# Altium PCB machkiemtranguon.PcbDoc (part 2 of 2)
Units mm, origin at the board's own origin, x right, y up, seen from the top; angles counter-clockwise.
Board outline 125.2 x 94.23 mm, 2 copper layers (Top Layer, Bottom Layer); 89 components, 67 nets, 385 pads, 74 vias.
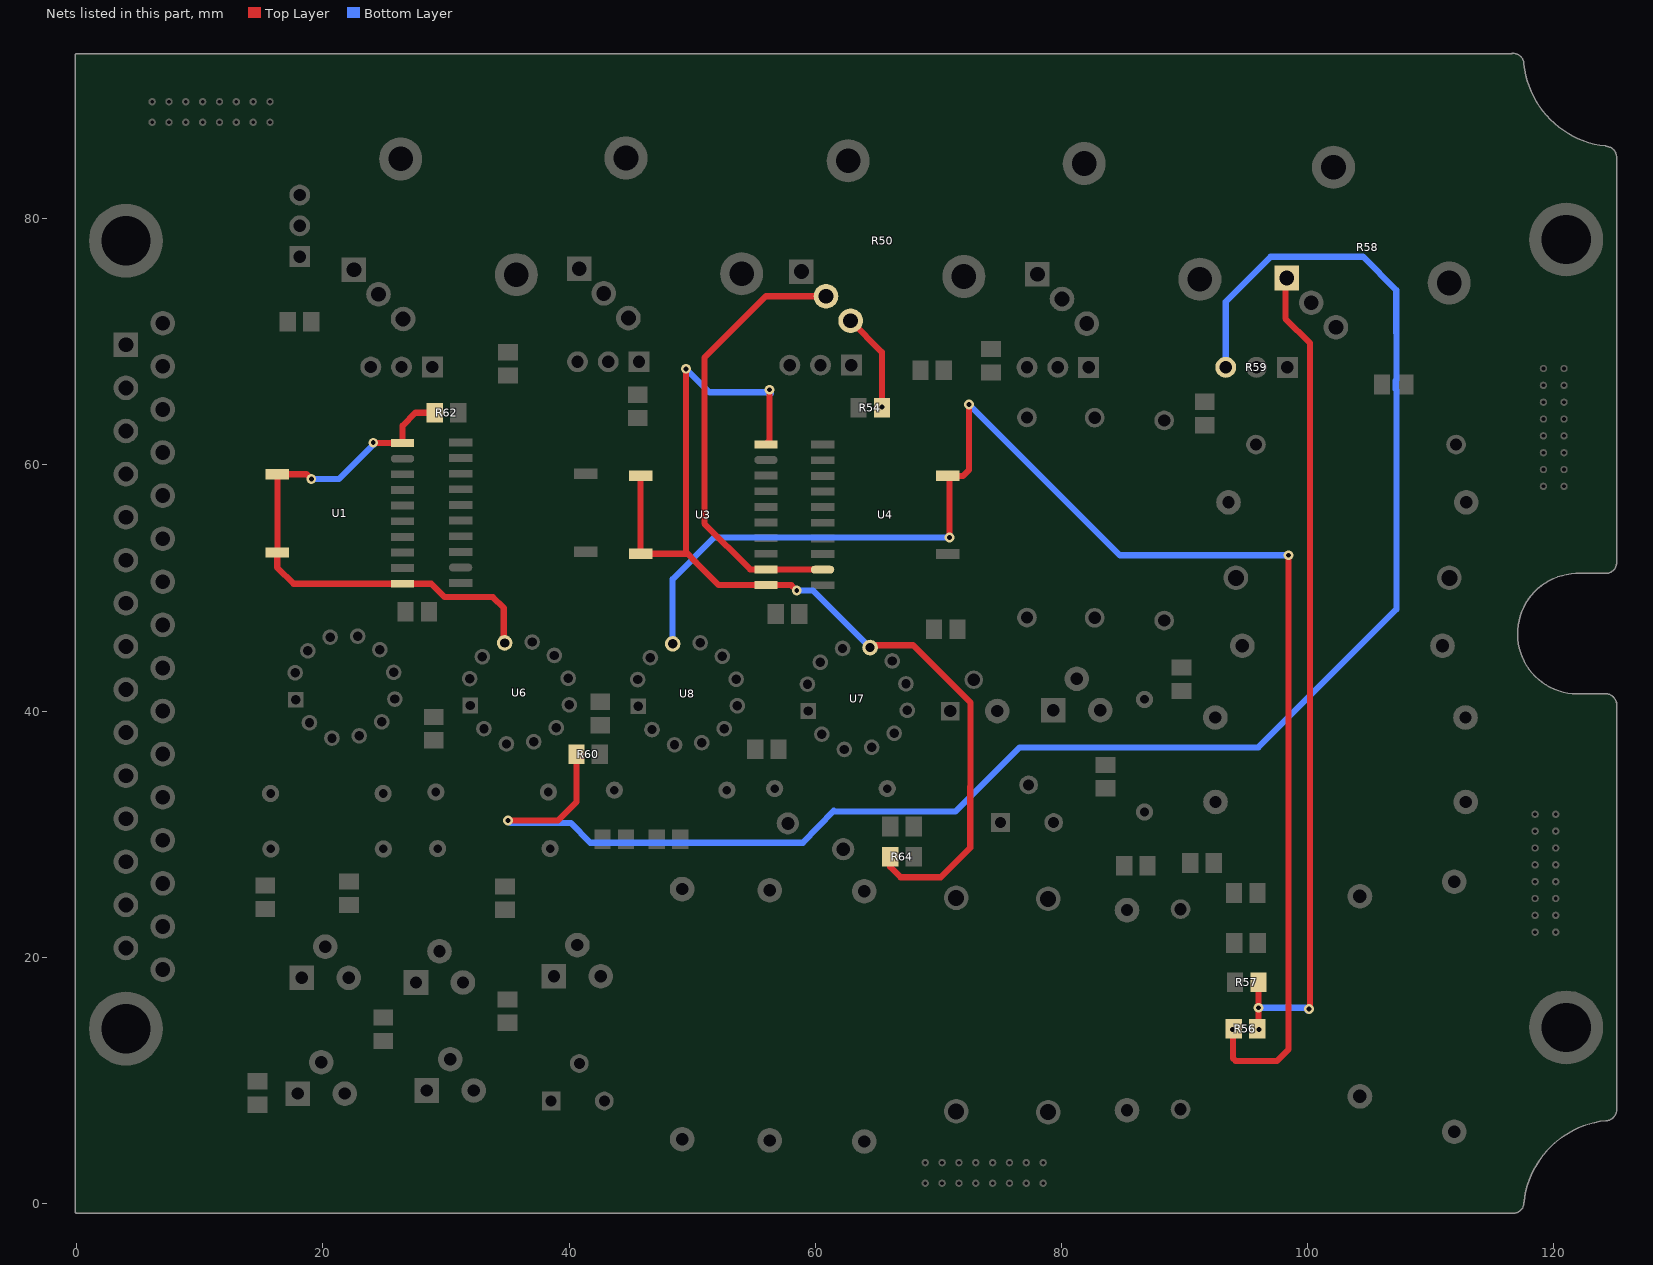
[diagram p2: the nets of this part, all layers, seen from the top]

## Via types
v1: diameter 0.8, hole 0.4, Top Layer to Bottom Layer, 74 vias

## Nets (pads, with @x,y where several pads share a name; then routed paths per layer and width w, separated by ;. In a path a pad name is that pad's centre, name@x,y a point inside that pad or via, vN(x,y) a via of type N, cw(c..) or ccw(c..) an arc to the next point about the centre after c; other vN are vias at no path point) (continued)
NetR50_2: R50.2 U3.8 U4.1 | length 36.9
  Top Layer w0.5: U3.8@55.672,51.486 U4.1@60.592,51.486 ; U3.8@55.997,51.505 54.72,51.505 50.997,55.228 50.997,68.7 55.997,73.7 R50.2@60.872,73.7
NetR50_3: R50.3 R54.1 | length 8.1
  Top Layer w0.5: R50.3@62.872,71.7 65.422,69.15 R54.1@65.422,64.65
  other v1: 65.426,64.698
NetR56_1: R56.1 U4.10 U8.10 | length 120.5
  Top Layer w0.5: U4.10@70.246,59.106 U4.10@70.752,59.106 70.897,59.106 v1(70.897,54.1) ; U4.10@70.997,59.1 70.997,59.106 72.003,59.106 72.497,59.6 v1(72.497,64.9) ; R56.1@93.922,14.25 93.922,11.8 94.147,11.575 97.522,11.575 98.44,12.493 v1(98.44,52.654)
  Bottom Layer w0.5: U8.10@48.69,45.407 48.415,45.682 48.415,50.718 51.797,54.1 v1@70.797,54.1 ; v1(72.497,64.9) 84.743,52.654 v1(98.44,52.654)
  other v1: 93.879,14.123
NetR56_2: R56.2 R57.2 R58.1 | length 68.2
  Top Layer w0.5: R56.2@95.998,14.199 R57.2@95.998,17.973 ; R58.1@98.197,75.4 98.197,71.875 100.197,69.875 v1@100.197,15.9
  Bottom Layer w0.5: v1(95.997,15.9) 99.797,15.9 v1@99.997,15.7
  other v1: 96.032,14.123 100.097,15.8
NetR59_3: R59.3 R60.1 | length 138.6
  Top Layer w0.5: v1@35.097,31.1 39.097,31.1 40.598,32.601 R60.1@40.598,36.498
  Bottom Layer w0.5: v1(35.041,31.115) 35.257,30.9 40.159,30.9 41.697,29.362 ; 41.719,29.3 58.997,29.3 61.497,31.9 61.547,31.85 71.397,31.85 76.597,37.05 95.98,37.05 107.203,48.273 107.203,66.091 107.15,66.144 107.15,66.848 107.203,66.901 107.203,70.7 ; R59.3@93.347,67.925 93.347,73.254 96.993,76.9 104.497,76.9 107.197,74.2 107.197,70.7
NetR62_2: R62.2 U1.9 U1.10 U1.11 U1.12 U6.10 | length 46.5
  Top Layer w0.5: v1(19.062,58.852) 18.684,59.23 U1.11@16.312,59.23 U1.10@16.312,52.88 16.296,52.88 16.296,51.661 17.617,50.34 U1.9@26.472,50.34 ; v1(24.097,61.8) 24.127,61.77 U1.12@26.472,61.77 26.472,63.175 27.524,64.227 R62.2@29.096,64.227 ; U1.9@26.472,50.4 U1.9@26.472,50.34 ; 29.872,49.251 33.821,49.251 34.697,48.375 U6.10@34.697,45.6 ; 29.872,49.275 28.807,50.34 U1.9@26.472,50.34 ; U6.10@34.697,45.475 U6.10@34.697,45.6 ; U6.10@34.765,45.532 U6.10@34.697,45.6
  Bottom Layer w0.5: v1(19.062,58.852) 21.325,58.852 24.097,61.624 v1(24.097,61.8)
NetR64_1: R64.1 U3.9 U3.10 U3.11 U3.12 U7.9 | length 85.6
  Top Layer w0.5: U3.10@45.797,52.95 U3.11@45.797,58.818 ; U3.10@45.837,52.775 49.497,52.775 v1(49.497,67.8) v1@49.497,67.9 ; 49.597,52.8 50.307,52.09 ; 50.307,52.089 52.161,50.235 U3.9@55.997,50.235 58.062,50.235 v1(58.497,49.8) ; U3.12@55.997,61.665 56.276,61.944 56.276,66.079 v1(56.297,66.1) ; U7.9@64.45,45.158 64.643,45.351 67.946,45.351 72.599,40.698 72.599,33.875 72.597,33.873 72.597,28.9 70.197,26.5 66.936,26.5 66.098,27.338 R64.1@66.098,28.173
  Bottom Layer w0.5: v1(49.497,67.8) 51.397,65.9 56.297,65.9 v1@56.397,65.8 ; v1(58.497,49.8) 59.808,49.8 U7.9@64.45,45.158
pads on no net: R6.4 R6.5 R15.4 R15.5 R47.4 R47.5 R50.4 R50.5 R58.4 R58.5 U1.3 U1.5 U1.6 U1.7 U1.8 U2.1 U2.2 U2.3 U2.4 U2.6 U2.9 U2.11 U2.12 U3.1 U3.2 U3.3 U3.6 U4.3 U4.6 U4.7 U4.8 U4.9 U4.11 U4.12 U5.2 U5.3 U5.6 U5.8 U5.11 U5.12 U6.2 U6.3 U6.6 U6.8 U6.11 U6.12 U7.2 U7.3 U7.6 U7.8 U7.11 U7.12 U8.2 U8.3 U8.6 U8.8 U8.11 U8.12

## Polygon pours and split planes (outlines as drawn)
GND on Top Layer "Top Layer-No Net" (solid, remove dead copper, pour order 9): 0,-0.8 116.684,-0.8 ccw(c116.697,-0.701) 116.699,-0.801 ccw(c116.684,0.088) 117.573,0.088 ccw(c116.684,0.088) 117.573,0.101 ccw(c117.476,0.125) 117.575,0.114 cw(c124.997,-0.7) 124.211,6.724 ccw(c124.222,6.824) 124.224,6.724 ccw(c124.209,7.613) 125.089,7.485 ccw(c124.997,7.525) 125.097,7.525 125.097,7.573 ccw(c124.209,7.613) 125.098,7.613 ccw(c124.209,7.613) 125.097,7.652 125.097,40.513 ccw(c124.998,40.525) 125.098,40.525 ccw(c124.998,40.525) 125.098,40.527 ccw(c124.209,40.512) 125.097,40.552 125.097,40.65 ccw(c124.997,40.65) 125.075,40.713 ccw(c124.209,40.512) 124.368,41.387 ccw(c124.318,41.3) 124.318,41.4 124.25,41.4 ccw(c124.209,40.512) 124.169,41.4 121.502,41.4 cw(c121.949,46.279) 121.779,51.176 ccw(c121.797,51.275) 121.797,51.175 124.21,51.175 ccw(c124.222,51.274) 124.224,51.174 ccw(c124.209,52.063) 125.083,51.898 ccw(c124.997,51.95) 125.097,51.95 125.097,52.023 ccw(c124.209,52.063) 125.098,52.063 ccw(c124.209,52.063) 125.097,52.102 125.097,84.993 ccw(c124.997,85.001) 125.098,85.001 ccw(c124.997,85.001) 125.098,85.002 ccw(c124.21,84.988) 124.243,85.875 ccw(c124.172,85.804) 124.183,85.903 cw(c124.997,93.325) 117.573,92.539 ccw(c117.473,92.55) 117.573,92.55 ccw(c117.473,92.55) 117.573,92.552 ccw(c116.684,92.537) 116.642,93.425 ccw(c116.647,93.325) 116.581,93.4 -0.003,93.4 ccw(c-0.003,93.3) -0.1,93.276 -0.1,-0.7 ccw(c0,-0.7)
GND on Bottom Layer "Top Layer-No Net1" (solid, remove dead copper, pour order 10): 0,-0.8 116.684,-0.8 ccw(c116.697,-0.701) 116.699,-0.801 ccw(c116.684,0.088) 117.573,0.088 ccw(c116.684,0.088) 117.573,0.101 ccw(c117.476,0.125) 117.575,0.114 cw(c124.997,-0.7) 124.211,6.724 ccw(c124.222,6.824) 124.224,6.724 ccw(c124.209,7.613) 125.089,7.485 ccw(c124.997,7.525) 125.097,7.525 125.097,7.573 ccw(c124.209,7.613) 125.098,7.613 ccw(c124.209,7.613) 125.097,7.652 125.097,40.513 ccw(c124.998,40.525) 125.098,40.525 ccw(c124.998,40.525) 125.098,40.527 ccw(c124.209,40.512) 125.097,40.552 125.097,40.65 ccw(c124.997,40.65) 125.075,40.713 ccw(c124.209,40.512) 124.368,41.387 ccw(c124.318,41.3) 124.318,41.4 124.25,41.4 ccw(c124.209,40.512) 124.169,41.4 121.502,41.4 cw(c121.949,46.279) 121.779,51.176 ccw(c121.797,51.275) 121.797,51.175 124.21,51.175 ccw(c124.222,51.274) 124.224,51.174 ccw(c124.209,52.063) 125.083,51.898 ccw(c124.997,51.95) 125.097,51.95 125.097,52.023 ccw(c124.209,52.063) 125.098,52.063 ccw(c124.209,52.063) 125.097,52.102 125.097,84.993 ccw(c124.997,85.001) 125.098,85.001 ccw(c124.997,85.001) 125.098,85.002 ccw(c124.21,84.988) 124.243,85.875 ccw(c124.172,85.804) 124.183,85.903 cw(c124.997,93.325) 117.573,92.539 ccw(c117.473,92.55) 117.573,92.55 ccw(c117.473,92.55) 117.573,92.552 ccw(c116.684,92.537) 116.642,93.425 ccw(c116.647,93.325) 116.581,93.4 -0.003,93.4 ccw(c-0.003,93.3) -0.1,93.276 -0.1,-0.7 ccw(c0,-0.7)

## Keep-outs
Keep-Out Layer:
  lines w0.2: -0.003,93.3 116.797,93.3 ; 0,93.3 0,-0.7 116.697,-0.7 ; 116.647,93.325 cw(c116.684,92.537) 117.473,92.55 ; 116.697,-0.701 ccw(c116.684,0.088) 117.472,0.125 ; 117.47,92.55 ccw(c124.997,93.325) 124.172,85.804 ; 117.476,0.125 cw(c124.997,-0.7) 124.319,6.836 ; 121.496,41.3 cw(c121.949,46.279) 122.119,51.277 ; 121.497,41.3 124.318,41.3 ; 121.797,51.275 124.222,51.275 ; 124.172,41.3 cw(c124.209,40.512) 124.998,40.525 ; 124.222,6.824 ccw(c124.209,7.613) 124.997,7.65 ; 124.222,51.274 ccw(c124.209,52.063) 124.997,52.1 ; 124.997,7.525 124.997,40.65 ; 124.997,51.95 124.997,85 ; 124.997,85.001 ccw(c124.21,84.988) 124.173,85.775 ; 116.697,-0.7 116.697,-0.7 ; 124.172,85.775 124.172,85.775

## Other copper
Top Layer:
  pour cut-out: -439.003,-258.7 -438.749,-258.7 -438.749,-258.446 -439.003,-258.446
  pour cut-out: -439.003,-258.7 -438.749,-258.7 -438.749,-258.446 -439.003,-258.446
  pour cut-out: -439.003,-258.7 -438.749,-258.7 -438.749,-258.446 -439.003,-258.446
  pour cut-out: -439.003,-258.7 -438.749,-258.7 -438.749,-258.446 -439.003,-258.446
  pour cut-out: -439.003,-258.7 -438.749,-258.7 -438.749,-258.446 -439.003,-258.446
  pour cut-out: -439.003,-258.7 -438.749,-258.7 -438.749,-258.446 -439.003,-258.446
  pour cut-out: -439.003,-258.7 -438.749,-258.7 -438.749,-258.446 -439.003,-258.446
  pour cut-out: -439.003,-258.7 -438.749,-258.7 -438.749,-258.446 -439.003,-258.446
  pour cut-out: -439.003,-258.7 -438.749,-258.7 -438.749,-258.446 -439.003,-258.446
  pour cut-out: -439.003,-258.7 -438.749,-258.7 -438.749,-258.446 -439.003,-258.446
  pour cut-out: -439.003,-258.7 -438.749,-258.7 -438.749,-258.446 -439.003,-258.446
  pour cut-out: -439.003,-258.7 -438.749,-258.7 -438.749,-258.446 -439.003,-258.446
  pour cut-out: -439.003,-258.7 -438.749,-258.7 -438.749,-258.446 -439.003,-258.446
  pour cut-out: -439.003,-258.7 -438.749,-258.7 -438.749,-258.446 -439.003,-258.446
  pour cut-out: -439.003,-258.7 -438.749,-258.7 -438.749,-258.446 -439.003,-258.446
  pour cut-out: -439.003,-258.7 -438.749,-258.7 -438.749,-258.446 -439.003,-258.446
  pour cut-out: -439.003,-258.7 -438.749,-258.7 -438.749,-258.446 -439.003,-258.446
  pour cut-out: -439.003,-258.7 -438.749,-258.7 -438.749,-258.446 -439.003,-258.446
  pour cut-out: -439.003,-258.7 -438.749,-258.7 -438.749,-258.446 -439.003,-258.446
  pour cut-out: -439.003,-258.7 -438.749,-258.7 -438.749,-258.446 -439.003,-258.446
  pour cut-out: -439.003,-258.7 -438.749,-258.7 -438.749,-258.446 -439.003,-258.446
  pour cut-out: -439.003,-258.7 -438.749,-258.7 -438.749,-258.446 -439.003,-258.446
  pour cut-out: -439.003,-258.7 -438.749,-258.7 -438.749,-258.446 -439.003,-258.446
  pour cut-out: -439.003,-258.7 -438.749,-258.7 -438.749,-258.446 -439.003,-258.446
  pour cut-out: -439.003,-258.7 -438.749,-258.7 -438.749,-258.446 -439.003,-258.446
  pour cut-out: -439.003,-258.7 -438.749,-258.7 -438.749,-258.446 -439.003,-258.446
  pour cut-out: -439.003,-258.7 -438.749,-258.7 -438.749,-258.446 -439.003,-258.446
  pour cut-out: -439.003,-258.7 -438.749,-258.7 -438.749,-258.446 -439.003,-258.446
  pour cut-out: -439.003,-258.7 -438.749,-258.7 -438.749,-258.446 -439.003,-258.446
  pour cut-out: -439.003,-258.7 -438.749,-258.7 -438.749,-258.446 -439.003,-258.446
  pour cut-out: -439.003,-258.7 -438.749,-258.7 -438.749,-258.446 -439.003,-258.446
  pour cut-out: -439.003,-258.7 -438.749,-258.7 -438.749,-258.446 -439.003,-258.446
  pour cut-out: -439.003,-258.7 -438.749,-258.7 -438.749,-258.446 -439.003,-258.446
  pour cut-out: -439.003,-258.7 -438.749,-258.7 -438.749,-258.446 -439.003,-258.446
  pour cut-out: -439.003,-258.7 -438.749,-258.7 -438.749,-258.446 -439.003,-258.446
  pour cut-out: -439.003,-258.7 -438.749,-258.7 -438.749,-258.446 -439.003,-258.446
  pour cut-out: -439.003,-258.7 -438.749,-258.7 -438.749,-258.446 -439.003,-258.446
  pour cut-out: -439.003,-258.7 -438.749,-258.7 -438.749,-258.446 -439.003,-258.446
  pour cut-out: -439.003,-258.7 -438.749,-258.7 -438.749,-258.446 -439.003,-258.446
  pour cut-out: -439.003,-258.7 -438.749,-258.7 -438.749,-258.446 -439.003,-258.446
  pour cut-out: -439.003,-258.7 -438.749,-258.7 -438.749,-258.446 -439.003,-258.446
  pour cut-out: -439.003,-258.7 -438.749,-258.7 -438.749,-258.446 -439.003,-258.446
  pour cut-out: -439.003,-258.7 -438.749,-258.7 -438.749,-258.446 -439.003,-258.446
  pour cut-out: -439.003,-258.7 -438.749,-258.7 -438.749,-258.446 -439.003,-258.446
  pour cut-out: -439.003,-258.7 -438.749,-258.7 -438.749,-258.446 -439.003,-258.446
  pour cut-out: -439.003,-258.7 -438.749,-258.7 -438.749,-258.446 -439.003,-258.446
  pour cut-out: -439.003,-258.7 -438.749,-258.7 -438.749,-258.446 -439.003,-258.446
  pour cut-out: -439.003,-258.7 -438.749,-258.7 -438.749,-258.446 -439.003,-258.446
  pour cut-out: -439.003,-258.7 -438.749,-258.7 -438.749,-258.446 -439.003,-258.446
  pour cut-out: -439.003,-258.7 -438.749,-258.7 -438.749,-258.446 -439.003,-258.446
  pour cut-out: -439.003,-258.7 -438.749,-258.7 -438.749,-258.446 -439.003,-258.446
  pour cut-out: -439.003,-258.7 -438.749,-258.7 -438.749,-258.446 -439.003,-258.446
  pour cut-out: -439.003,-258.7 -438.749,-258.7 -438.749,-258.446 -439.003,-258.446
  pour cut-out: -439.003,-258.7 -438.749,-258.7 -438.749,-258.446 -439.003,-258.446
  pour cut-out: -439.003,-258.7 -438.749,-258.7 -438.749,-258.446 -439.003,-258.446
  pour cut-out: -439.003,-258.7 -438.749,-258.7 -438.749,-258.446 -439.003,-258.446
  pour cut-out: -439.003,-258.7 -438.749,-258.7 -438.749,-258.446 -439.003,-258.446
  pour cut-out: -439.003,-258.7 -438.749,-258.7 -438.749,-258.446 -439.003,-258.446
  pour cut-out: -439.003,-258.7 -438.749,-258.7 -438.749,-258.446 -439.003,-258.446
  pour cut-out: -439.003,-258.7 -438.749,-258.7 -438.749,-258.446 -439.003,-258.446
  pour cut-out: -439.003,-258.7 -438.749,-258.7 -438.749,-258.446 -439.003,-258.446
  pour cut-out: -439.003,-258.7 -438.749,-258.7 -438.749,-258.446 -439.003,-258.446
  pour cut-out: -439.003,-258.7 -438.749,-258.7 -438.749,-258.446 -439.003,-258.446
  pour cut-out: -439.003,-258.7 -438.749,-258.7 -438.749,-258.446 -439.003,-258.446
  pour cut-out: -439.003,-258.7 -438.749,-258.7 -438.749,-258.446 -439.003,-258.446
  pour cut-out: -439.003,-258.7 -438.749,-258.7 -438.749,-258.446 -439.003,-258.446
  pour cut-out: -439.003,-258.7 -438.749,-258.7 -438.749,-258.446 -439.003,-258.446
  pour cut-out: -439.003,-258.7 -438.749,-258.7 -438.749,-258.446 -439.003,-258.446
  pour cut-out: -439.003,-258.7 -438.749,-258.7 -438.749,-258.446 -439.003,-258.446
  pour cut-out: -439.003,-258.7 -438.749,-258.7 -438.749,-258.446 -439.003,-258.446
  pour cut-out: -439.003,-258.7 -438.749,-258.7 -438.749,-258.446 -439.003,-258.446
  pour cut-out: -439.003,-258.7 -438.749,-258.7 -438.749,-258.446 -439.003,-258.446
  pour cut-out: -439.003,-258.7 -438.749,-258.7 -438.749,-258.446 -439.003,-258.446
  pour cut-out: -439.003,-258.7 -438.749,-258.7 -438.749,-258.446 -439.003,-258.446
  pour cut-out: -439.003,-258.7 -438.749,-258.7 -438.749,-258.446 -439.003,-258.446
  pour cut-out: -439.003,-258.7 -438.749,-258.7 -438.749,-258.446 -439.003,-258.446
  pour cut-out: -439.003,-258.7 -438.749,-258.7 -438.749,-258.446 -439.003,-258.446
  pour cut-out: -439.003,-258.7 -438.749,-258.7 -438.749,-258.446 -439.003,-258.446
  pour cut-out: -439.003,-258.7 -438.749,-258.7 -438.749,-258.446 -439.003,-258.446
  pour cut-out: -439.003,-258.7 -438.749,-258.7 -438.749,-258.446 -439.003,-258.446
  pour cut-out: -439.003,-258.7 -438.749,-258.7 -438.749,-258.446 -439.003,-258.446
  pour cut-out: -439.003,-258.7 -438.749,-258.7 -438.749,-258.446 -439.003,-258.446
  pour cut-out: -439.003,-258.7 -438.749,-258.7 -438.749,-258.446 -439.003,-258.446
  pour cut-out: -439.003,-258.7 -438.749,-258.7 -438.749,-258.446 -439.003,-258.446
  pour cut-out: -439.003,-258.7 -438.749,-258.7 -438.749,-258.446 -439.003,-258.446
  pour cut-out: -439.003,-258.7 -438.749,-258.7 -438.749,-258.446 -439.003,-258.446
  pour cut-out: -439.003,-258.7 -438.749,-258.7 -438.749,-258.446 -439.003,-258.446
  pour cut-out: -439.003,-258.7 -438.749,-258.7 -438.749,-258.446 -439.003,-258.446
  pour cut-out: -439.003,-258.7 -438.749,-258.7 -438.749,-258.446 -439.003,-258.446
  pour cut-out: -439.003,-258.7 -438.749,-258.7 -438.749,-258.446 -439.003,-258.446
  pour cut-out: -439.003,-258.7 -438.749,-258.7 -438.749,-258.446 -439.003,-258.446
  pour cut-out: -439.003,-258.7 -438.749,-258.7 -438.749,-258.446 -439.003,-258.446
  pour cut-out: -439.003,-258.7 -438.749,-258.7 -438.749,-258.446 -439.003,-258.446
  pour cut-out: -439.003,-258.7 -438.749,-258.7 -438.749,-258.446 -439.003,-258.446
  pour cut-out: -439.003,-258.7 -438.749,-258.7 -438.749,-258.446 -439.003,-258.446
  pour cut-out: -439.003,-258.7 -438.749,-258.7 -438.749,-258.446 -439.003,-258.446
  pour cut-out: -439.003,-258.7 -438.749,-258.7 -438.749,-258.446 -439.003,-258.446
  pour cut-out: -439.003,-258.7 -438.749,-258.7 -438.749,-258.446 -439.003,-258.446
  pour cut-out: -439.003,-258.7 -438.749,-258.7 -438.749,-258.446 -439.003,-258.446
  pour cut-out: -439.003,-258.7 -438.749,-258.7 -438.749,-258.446 -439.003,-258.446
  pour cut-out: -439.003,-258.7 -438.749,-258.7 -438.749,-258.446 -439.003,-258.446
  pour cut-out: -439.003,-258.7 -438.749,-258.7 -438.749,-258.446 -439.003,-258.446
  pour cut-out: -439.003,-258.7 -438.749,-258.7 -438.749,-258.446 -439.003,-258.446
  pour cut-out: -439.003,-258.7 -438.749,-258.7 -438.749,-258.446 -439.003,-258.446
  pour cut-out: -439.003,-258.7 -438.749,-258.7 -438.749,-258.446 -439.003,-258.446
  pour cut-out: -439.003,-258.7 -438.749,-258.7 -438.749,-258.446 -439.003,-258.446
  pour cut-out: -439.003,-258.7 -438.749,-258.7 -438.749,-258.446 -439.003,-258.446
  pour cut-out: -439.003,-258.7 -438.749,-258.7 -438.749,-258.446 -439.003,-258.446
  pour cut-out: -439.003,-258.7 -438.749,-258.7 -438.749,-258.446 -439.003,-258.446
  pour cut-out: -439.003,-258.7 -438.749,-258.7 -438.749,-258.446 -439.003,-258.446
  pour cut-out: -439.003,-258.7 -438.749,-258.7 -438.749,-258.446 -439.003,-258.446
  pour cut-out: -439.003,-258.7 -438.749,-258.7 -438.749,-258.446 -439.003,-258.446
  pour cut-out: -439.003,-258.7 -438.749,-258.7 -438.749,-258.446 -439.003,-258.446
  pour cut-out: -439.003,-258.7 -438.749,-258.7 -438.749,-258.446 -439.003,-258.446
  pour cut-out: -439.003,-258.7 -438.749,-258.7 -438.749,-258.446 -439.003,-258.446
  pour cut-out: -439.003,-258.7 -438.749,-258.7 -438.749,-258.446 -439.003,-258.446
  pour cut-out: -439.003,-258.7 -438.749,-258.7 -438.749,-258.446 -439.003,-258.446
  pour cut-out: -439.003,-258.7 -438.749,-258.7 -438.749,-258.446 -439.003,-258.446
  pour cut-out: -439.003,-258.7 -438.749,-258.7 -438.749,-258.446 -439.003,-258.446
  pour cut-out: -439.003,-258.7 -438.749,-258.7 -438.749,-258.446 -439.003,-258.446
  pour cut-out: -439.003,-258.7 -438.749,-258.7 -438.749,-258.446 -439.003,-258.446
  pour cut-out: -439.003,-258.7 -438.749,-258.7 -438.749,-258.446 -439.003,-258.446
  pour cut-out: -439.003,-258.7 -438.749,-258.7 -438.749,-258.446 -439.003,-258.446
  pour cut-out: -439.003,-258.7 -438.749,-258.7 -438.749,-258.446 -439.003,-258.446
  pour cut-out: -439.003,-258.7 -438.749,-258.7 -438.749,-258.446 -439.003,-258.446
  pour cut-out: -439.003,-258.7 -438.749,-258.7 -438.749,-258.446 -439.003,-258.446
  pour cut-out: -439.003,-258.7 -438.749,-258.7 -438.749,-258.446 -439.003,-258.446
  pour cut-out: -439.003,-258.7 -438.749,-258.7 -438.749,-258.446 -439.003,-258.446
  pour cut-out: -439.003,-258.7 -438.749,-258.7 -438.749,-258.446 -439.003,-258.446
  pour cut-out: -439.003,-258.7 -438.749,-258.7 -438.749,-258.446 -439.003,-258.446
  pour cut-out: -439.003,-258.7 -438.749,-258.7 -438.749,-258.446 -439.003,-258.446
  pour cut-out: -439.003,-258.7 -438.749,-258.7 -438.749,-258.446 -439.003,-258.446
  pour cut-out: -439.003,-258.7 -438.749,-258.7 -438.749,-258.446 -439.003,-258.446
  pour cut-out: -439.003,-258.7 -438.749,-258.7 -438.749,-258.446 -439.003,-258.446
  pour cut-out: -439.003,-258.7 -438.749,-258.7 -438.749,-258.446 -439.003,-258.446
  pour cut-out: -439.003,-258.7 -438.749,-258.7 -438.749,-258.446 -439.003,-258.446
  pour cut-out: -439.003,-258.7 -438.749,-258.7 -438.749,-258.446 -439.003,-258.446
  pour cut-out: -439.003,-258.7 -438.749,-258.7 -438.749,-258.446 -439.003,-258.446
  pour cut-out: -439.003,-258.7 -438.749,-258.7 -438.749,-258.446 -439.003,-258.446
  pour cut-out: -439.003,-258.7 -438.749,-258.7 -438.749,-258.446 -439.003,-258.446
  pour cut-out: -439.003,-258.7 -438.749,-258.7 -438.749,-258.446 -439.003,-258.446
  pour cut-out: -439.003,-258.7 -438.749,-258.7 -438.749,-258.446 -439.003,-258.446
  pour cut-out: -439.003,-258.7 -438.749,-258.7 -438.749,-258.446 -439.003,-258.446
  pour cut-out: -439.003,-258.7 -438.749,-258.7 -438.749,-258.446 -439.003,-258.446
  pour cut-out: -439.003,-258.7 -438.749,-258.7 -438.749,-258.446 -439.003,-258.446
  pour cut-out: -439.003,-258.7 -438.749,-258.7 -438.749,-258.446 -439.003,-258.446
  pour cut-out: -439.003,-258.7 -438.749,-258.7 -438.749,-258.446 -439.003,-258.446
  pour cut-out: -439.003,-258.7 -438.749,-258.7 -438.749,-258.446 -439.003,-258.446
  pour cut-out: -439.003,-258.7 -438.749,-258.7 -438.749,-258.446 -439.003,-258.446
  pour cut-out: -439.003,-258.7 -438.749,-258.7 -438.749,-258.446 -439.003,-258.446
  pour cut-out: -439.003,-258.7 -438.749,-258.7 -438.749,-258.446 -439.003,-258.446
  pour cut-out: -439.003,-258.7 -438.749,-258.7 -438.749,-258.446 -439.003,-258.446
  pour cut-out: -439.003,-258.7 -438.749,-258.7 -438.749,-258.446 -439.003,-258.446
  pour cut-out: -439.003,-258.7 -438.749,-258.7 -438.749,-258.446 -439.003,-258.446
  pour cut-out: -439.003,-258.7 -438.749,-258.7 -438.749,-258.446 -439.003,-258.446
  pour cut-out: -439.003,-258.7 -438.749,-258.7 -438.749,-258.446 -439.003,-258.446
  pour cut-out: -439.003,-258.7 -438.749,-258.7 -438.749,-258.446 -439.003,-258.446
  pour cut-out: -439.003,-258.7 -438.749,-258.7 -438.749,-258.446 -439.003,-258.446
  pour cut-out: -439.003,-258.7 -438.749,-258.7 -438.749,-258.446 -439.003,-258.446
  pour cut-out: -439.003,-258.7 -438.749,-258.7 -438.749,-258.446 -439.003,-258.446
  pour cut-out: -439.003,-258.7 -438.749,-258.7 -438.749,-258.446 -439.003,-258.446
  pour cut-out: -439.003,-258.7 -438.749,-258.7 -438.749,-258.446 -439.003,-258.446
  pour cut-out: -439.003,-258.7 -438.749,-258.7 -438.749,-258.446 -439.003,-258.446
  pour cut-out: -439.003,-258.7 -438.749,-258.7 -438.749,-258.446 -439.003,-258.446
  pour cut-out: -439.003,-258.7 -438.749,-258.7 -438.749,-258.446 -439.003,-258.446
  pour cut-out: -439.003,-258.7 -438.749,-258.7 -438.749,-258.446 -439.003,-258.446
  pour cut-out: -439.003,-258.7 -438.749,-258.7 -438.749,-258.446 -439.003,-258.446
  pour cut-out: -439.003,-258.7 -438.749,-258.7 -438.749,-258.446 -439.003,-258.446
  pour cut-out: -439.003,-258.7 -438.749,-258.7 -438.749,-258.446 -439.003,-258.446
  pour cut-out: -439.003,-258.7 -438.749,-258.7 -438.749,-258.446 -439.003,-258.446
  pour cut-out: -439.003,-258.7 -438.749,-258.7 -438.749,-258.446 -439.003,-258.446
  pour cut-out: -439.003,-258.7 -438.749,-258.7 -438.749,-258.446 -439.003,-258.446
  pour cut-out: -439.003,-258.7 -438.749,-258.7 -438.749,-258.446 -439.003,-258.446
  pour cut-out: -439.003,-258.7 -438.749,-258.7 -438.749,-258.446 -439.003,-258.446
  pour cut-out: -439.003,-258.7 -438.749,-258.7 -438.749,-258.446 -439.003,-258.446
  pour cut-out: -439.003,-258.7 -438.749,-258.7 -438.749,-258.446 -439.003,-258.446
  pour cut-out: -439.003,-258.7 -438.749,-258.7 -438.749,-258.446 -439.003,-258.446
  pour cut-out: -439.003,-258.7 -438.749,-258.7 -438.749,-258.446 -439.003,-258.446
  pour cut-out: -439.003,-258.7 -438.749,-258.7 -438.749,-258.446 -439.003,-258.446
  pour cut-out: -439.003,-258.7 -438.749,-258.7 -438.749,-258.446 -439.003,-258.446
  pour cut-out: -439.003,-258.7 -438.749,-258.7 -438.749,-258.446 -439.003,-258.446
  pour cut-out: -439.003,-258.7 -438.749,-258.7 -438.749,-258.446 -439.003,-258.446
  pour cut-out: -439.003,-258.7 -438.749,-258.7 -438.749,-258.446 -439.003,-258.446
  pour cut-out: -439.003,-258.7 -438.749,-258.7 -438.749,-258.446 -439.003,-258.446
  pour cut-out: -439.003,-258.7 -438.749,-258.7 -438.749,-258.446 -439.003,-258.446
  pour cut-out: -439.003,-258.7 -438.749,-258.7 -438.749,-258.446 -439.003,-258.446
  pour cut-out: -439.003,-258.7 -438.749,-258.7 -438.749,-258.446 -439.003,-258.446
  pour cut-out: -439.003,-258.7 -438.749,-258.7 -438.749,-258.446 -439.003,-258.446
  pour cut-out: -439.003,-258.7 -438.749,-258.7 -438.749,-258.446 -439.003,-258.446
  pour cut-out: -439.003,-258.7 -438.749,-258.7 -438.749,-258.446 -439.003,-258.446
  pour cut-out: -439.003,-258.7 -438.749,-258.7 -438.749,-258.446 -439.003,-258.446
  pour cut-out: -439.003,-258.7 -438.749,-258.7 -438.749,-258.446 -439.003,-258.446
  pour cut-out: -439.003,-258.7 -438.749,-258.7 -438.749,-258.446 -439.003,-258.446
  pour cut-out: -439.003,-258.7 -438.749,-258.7 -438.749,-258.446 -439.003,-258.446
Bottom Layer:
  rectangle net GND: 69.497,32.5 70.997,36.5
  pour cut-out: -439.003,-258.7 -438.749,-258.7 -438.749,-258.446 -439.003,-258.446
  pour cut-out: -439.003,-258.7 -438.749,-258.7 -438.749,-258.446 -439.003,-258.446
  pour cut-out: -439.003,-258.7 -438.749,-258.7 -438.749,-258.446 -439.003,-258.446
  pour cut-out: -439.003,-258.7 -438.749,-258.7 -438.749,-258.446 -439.003,-258.446
  pour cut-out: -439.003,-258.7 -438.749,-258.7 -438.749,-258.446 -439.003,-258.446
  pour cut-out: -439.003,-258.7 -438.749,-258.7 -438.749,-258.446 -439.003,-258.446
  pour cut-out: -439.003,-258.7 -438.749,-258.7 -438.749,-258.446 -439.003,-258.446
  pour cut-out: -439.003,-258.7 -438.749,-258.7 -438.749,-258.446 -439.003,-258.446

## Silkscreen, mask and mechanical layers (free items; w line width, h text height)
Top Overlay:
  lines w0.254: 85.072,0.747 85.072,4.747 108.981,4.747 108.981,0.747 85.072,0.747
  text "DC14D" at 9,79.75 h1 r270
  text "+27V" at 10.797,60.8 h0.8
  text "A313-V.08.02" at 85.819,1.747 h2
Mechanical 1:
  circle w0.013: c109.997,156.319 r1.6
  circle w0.013: c-7.003,156.319 r1.6
  circle w0.013: c-7.003,92.319 r1.6
  circle w0.013: c109.997,92.319 r1.6
  lines w0.013: -11.003,100.319 -11.003,148.319 ; -11.003,100.319 -5.003,100.319 -5.003,148.319 -11.003,148.319 ; -11.003,100.319 -11.003,77.319 102.165,77.319 ccw(c102.165,79.319) 104.137,78.986 cw(c113.997,77.319) 112.33,87.179 ccw(c111.997,89.151) 113.997,89.151 113.997,117.119 ccw(c111.997,117.119) 111.997,119.119 110.997,119.119 cw(c110.997,124.319) 110.997,129.519 111.997,129.519 ccw(c111.997,131.519) 113.997,131.519 113.997,159.487 ccw(c111.997,159.487) 112.33,161.459 cw(c113.997,171.319) 104.137,169.653 ccw(c102.165,169.319) 102.165,171.319 -11.003,171.319 -11.003,148.319
Mechanical 4:
  circle w0.025: c169.822,61.531 r0.191
  circle w0.025: c169.822,54.393 r0.254
  circle w0.025: c169.822,47.256 r0.318
  circle w0.025: c169.822,40.118 r0.381
  circle w0.025: c169.822,32.981 r0.445
  circle w0.025: c169.822,25.844 r0.508
  circle w0.025: c169.822,18.706 r0.572
  lines w0.025: 158.405,22.275 329.271,22.275 ; 158.405,29.412 329.271,29.412 ; 158.405,36.55 329.271,36.55 ; 158.405,43.687 329.271,43.687 ; 158.405,50.824 329.271,50.824 ; 158.405,57.962 329.271,57.962 ; 158.405,65.099 329.271,65.099 ; 158.405,72.237 329.271,72.237 ; 158.405,79.374 329.271,79.374 ; 181.24,15.137 181.24,72.237 ; 229.271,15.137 229.271,72.237 ; 277.302,15.137 277.302,72.237 ; 309.586,15.137 309.586,72.237 ; 158.405,15.137 158.405,85.724 329.271,85.724 329.271,15.137 158.405,15.137
  text "DRILL CHART: TOP to BOTTOM" at 210.818,80.962 h0.8
  text "ALL UNITS ARE IN MILS" at 217.168,74.612 h0.8
  text "FIGURE" at 162.202,67.474 h0.8
  text "SIZE" at 200.175,67.474 h0.8
  text "TOLERANCE" at 241.857,67.474 h0.8
  text "PLATED" at 285.824,67.474 h0.8
  text "QTY" at 315.618,67.474 h0.8
  text "10.0" at 200.175,59.943 h0.8
  text "+3.0/-3.0" at 241.857,59.943 h0.8
  text "PLATED" at 285.824,59.943 h0.8
  text "52" at 316.888,59.943 h0.8
  text "25.0" at 200.175,52.806 h0.8
  text "+3.0/-3.0" at 241.857,52.806 h0.8
  text "PLATED" at 285.824,52.806 h0.8
  text "2" at 318.158,52.806 h0.8
  text "36.0" at 200.175,45.668 h0.8
  text "+3.0/-3.0" at 241.857,45.668 h0.8
  text "PLATED" at 285.824,45.668 h0.8
  text "8" at 318.158,45.668 h0.8
  text "42.0" at 200.175,38.531 h0.8
  text "+3.0/-3.0" at 241.857,38.531 h0.8
  text "PLATED" at 285.824,38.531 h0.8
  text "31" at 316.888,38.531 h0.8
  text "50.0" at 200.175,31.393 h0.8
  text "+3.0/-3.0" at 241.857,31.393 h0.8
  text "PLATED" at 285.824,31.393 h0.8
  text "41" at 316.888,31.393 h0.8
  text "120.0" at 198.905,24.256 h0.8
  text "+3.0/-3.0" at 241.857,24.256 h0.8
  text "PLATED" at 285.824,24.256 h0.8
  text "4" at 318.158,24.256 h0.8
  text "140.0" at 198.905,17.119 h0.8
  text "+3.0/-3.0" at 241.857,17.119 h0.8
  text "PLATED" at 285.824,17.119 h0.8
  text "2" at 318.158,17.119 h0.8
Mechanical 5:
  lines w0.025: -439.638,-258.7 -438.368,-258.7 ; -439.003,-259.335 -439.003,-258.065

## Text inside footprints (layer, text, board x,y; h text height)
C1: Mechanical 6 "1" at 62.069,28.775 h0.8 r180; Mechanical 6 "2" at 57.569,30.875 h0.8 r180
D2: Mechanical 6 "1" at 82.697,47.372 h0.8 r90; Mechanical 6 "2" at 82.697,63.628 h0.8 r90
D4: Mechanical 6 "2" at 77.197,47.797 h0.8 r270; Mechanical 6 "1" at 77.197,64.053 h0.8 r270
D18: Mechanical 6 "1" at 88.347,47.147 h0.8 r90; Mechanical 6 "2" at 88.347,63.403 h0.8 r90
D20: Mechanical 6 "2" at 111.85,61.65 h0.8; Mechanical 6 "1" at 95.594,61.65 h0.8
D22: Mechanical 6 "1" at 89.672,7.447 h0.8 r90; Mechanical 6 "2" at 89.672,23.703 h0.8 r90
DC14B: Top Overlay "B" at 6.146,74.244 h1 r270; Top Overlay "A" at 3.19,74.371 h1 r270; Top Overlay "1" at 8.942,72.226 h1 r270; Top Overlay "1" at 0.958,70.42 h1 r270; Top Overlay "15" at 0.629,21.264 h1 r270; Top Overlay "16" at 9.323,19.639 h1 r270; Bottom Overlay "A" at 3.214,73.698 h1 r270; Bottom Overlay "B" at 6.135,73.698 h1 r270; Bottom Overlay "1" at 0.928,70.142 h1 r270; Bottom Overlay "1" at 8.929,71.92 h1 r270; Bottom Overlay "15" at 0.674,20.104 h1 r270; Bottom Overlay "16" at 9.31,18.453 h1 r270
R5: Mechanical 6 "3" at 25.98,67.95 h0.8 r180; Mechanical 6 "1" at 30.98,67.95 h0.8 r180; Mechanical 6 "2" at 28.48,67.95 h0.8 r180
R6: Mechanical 6 "4" at 25.509,86.12 h0.8 r270; Mechanical 6 "5" at 34.909,76.72 h0.8 r270; Mechanical 6 "2" at 23.709,75.12 h0.8 r270; Mechanical 6 "1" at 21.709,77.12 h0.8 r270; Mechanical 6 "3" at 25.709,73.12 h0.8 r270
R8: Mechanical 6 "3" at 42.765,68.375 h0.8 r180; Mechanical 6 "1" at 47.765,68.375 h0.8 r180; Mechanical 6 "2" at 45.265,68.375 h0.8 r180
R10: Mechanical 6 "1" at 71.447,7.693 h0.8 r90; Mechanical 6 "2" at 71.447,25.028 h0.8 r90
R14: Mechanical 6 "2" at 78.922,24.953 h0.8 r90; Mechanical 6 "1" at 78.922,7.618 h0.8 r90
R15: Mechanical 6 "4" at 81.034,85.745 h0.8 r270; Mechanical 6 "5" at 90.434,76.345 h0.8 r270; Mechanical 6 "2" at 79.234,74.745 h0.8 r270; Mechanical 6 "1" at 77.234,76.745 h0.8 r270; Mechanical 6 "3" at 81.234,72.745 h0.8 r270
R17: Mechanical 6 "3" at 79.29,67.925 h0.8 r180; Mechanical 6 "1" at 84.29,67.925 h0.8 r180; Mechanical 6 "2" at 81.79,67.925 h0.8 r180
R32: Mechanical 6 "2" at 104.247,8.897 h0.8 r270; Mechanical 6 "1" at 104.247,25.153 h0.8 r270
R41: Mechanical 6 "1" at 94.494,45.3 h0.8; Mechanical 6 "2" at 110.75,45.3 h0.8
R43: Mechanical 6 "1" at 111.304,50.825 h0.8 r180; Mechanical 6 "2" at 93.969,50.825 h0.8 r180
R46: Mechanical 6 "3" at 18.122,79.832 h0.8 r90; Mechanical 6 "1" at 18.122,74.832 h0.8 r90; Mechanical 6 "2" at 18.122,77.332 h0.8 r90
R47: Mechanical 6 "3" at 44.009,73.195 h0.8 r270; Mechanical 6 "1" at 40.009,77.195 h0.8 r270; Mechanical 6 "2" at 42.009,75.195 h0.8 r270; Mechanical 6 "5" at 53.209,76.795 h0.8 r270; Mechanical 6 "4" at 43.809,86.195 h0.8 r270
R49: Mechanical 6 "3" at 60.015,68.1 h0.8 r180; Mechanical 6 "1" at 65.015,68.1 h0.8 r180; Mechanical 6 "2" at 62.515,68.1 h0.8 r180
R50: Mechanical 6 "4" at 61.859,85.97 h0.8 r270; Mechanical 6 "5" at 71.259,76.57 h0.8 r270; Mechanical 6 "2" at 60.059,74.97 h0.8 r270; Mechanical 6 "1" at 58.059,76.97 h0.8 r270; Mechanical 6 "3" at 62.059,72.97 h0.8 r270
R58: Mechanical 6 "4" at 101.284,85.445 h0.8 r270; Mechanical 6 "5" at 110.684,76.045 h0.8 r270; Mechanical 6 "2" at 99.484,74.445 h0.8 r270; Mechanical 6 "1" at 97.484,76.445 h0.8 r270; Mechanical 6 "3" at 101.484,72.445 h0.8 r270
R59: Mechanical 6 "2" at 97.93,67.925 h0.8 r180; Mechanical 6 "1" at 100.43,67.925 h0.8 r180; Mechanical 6 "3" at 95.43,67.925 h0.8 r180
T2: Top Overlay "C" at 74.564,37.883 h0.8; Top Overlay "E" at 73.747,43.112 h0.8; Top Overlay "B" at 71.186,37.883 h0.8; Mechanical 6 "3" at 73.993,40.94 h0.8 r270; Mechanical 6 "1" at 69.548,40.889 h0.8 r270; Mechanical 6 "2" at 71.427,43.81 h0.8 r270
T3: Top Overlay "B" at 79.561,37.958 h0.8; Top Overlay "E" at 82.888,42.25 h0.8; Top Overlay "C" at 82.939,37.958 h0.8; Mechanical 6 "2" at 79.802,43.885 h0.8 r270; Mechanical 6 "1" at 77.923,40.964 h0.8 r270; Mechanical 6 "3" at 82.368,41.015 h0.8 r270
T4: Top Overlay "B" at 75.745,28.935 h0.8; Top Overlay "E" at 79.479,28.859 h0.8; Top Overlay "C" at 78.108,34.599 h0.8; Mechanical 6 "1" at 73.625,31.839 h0.8 r270; Mechanical 6 "2" at 79.619,30.34 h0.8 r270; Mechanical 6 "3" at 76.546,34.938 h0.8 r270
T5: Top Overlay "C" at 21.881,16.208 h0.8; Top Overlay "E" at 21.597,20.5 h0.8; Top Overlay "B" at 18.503,16.208 h0.8; Mechanical 6 "3" at 21.31,19.265 h0.8 r270; Mechanical 6 "1" at 16.865,19.214 h0.8 r270; Mechanical 6 "2" at 18.744,22.135 h0.8 r270
T6: Top Overlay "C" at 20.997,6.4 h0.8; Top Overlay "E" at 21.197,10.7 h0.8; Top Overlay "B" at 18.297,6.4 h0.8; Mechanical 6 "3" at 20.993,9.865 h0.8 r270; Mechanical 6 "1" at 16.548,9.814 h0.8 r270; Mechanical 6 "2" at 18.427,12.735 h0.8 r270
T7: Top Overlay "C" at 32.039,7.062 h0.8; Top Overlay "E" at 31.697,11.078 h0.8; Top Overlay "B" at 28.661,7.062 h0.8; Mechanical 6 "3" at 31.468,10.118 h0.8 r270; Mechanical 6 "1" at 27.023,10.067 h0.8 r270; Mechanical 6 "2" at 28.902,12.988 h0.8 r270
T8: Top Overlay "C" at 41.608,11.974 h0.8; Top Overlay "E" at 42.979,6.234 h0.8; Top Overlay "B" at 39.245,6.31 h0.8; Mechanical 6 "3" at 40.046,12.313 h0.8 r270; Mechanical 6 "2" at 43.119,7.715 h0.8 r270; Mechanical 6 "1" at 37.125,9.214 h0.8 r270
T9: Top Overlay "C" at 31.164,15.833 h0.8; Top Overlay "E" at 30.897,20.3 h0.8; Top Overlay "B" at 27.786,15.833 h0.8; Mechanical 6 "3" at 30.593,18.89 h0.8 r270; Mechanical 6 "1" at 26.148,18.839 h0.8 r270; Mechanical 6 "2" at 28.027,21.76 h0.8 r270
T10: Top Overlay "C" at 41.695,16.025 h0.8; Top Overlay "B" at 39.095,16.025 h0.8; Top Overlay "E" at 41.995,20.525 h0.8; Mechanical 6 "3" at 41.793,19.39 h0.8 r270; Mechanical 6 "1" at 37.348,19.339 h0.8 r270; Mechanical 6 "2" at 39.227,22.26 h0.8 r270
U1: Mechanical 6 "8" at 26.408,52.88 h0.8 r270; Mechanical 6 "7" at 26.408,54.15 h0.8 r270; Mechanical 6 "6" at 26.408,55.42 h0.8 r270; Mechanical 6 "9" at 26.408,51.61 h0.8 r270; Mechanical 6 "11" at 16.184,60.5 h0.8 r270; Mechanical 6 "1" at 26.408,61.77 h0.8 r270; Mechanical 6 "2" at 26.408,60.5 h0.8 r270; Mechanical 6 "10" at 16.184,54.15 h0.8 r270; Mechanical 6 "4" at 26.408,57.96 h0.8 r270; Mechanical 6 "5" at 26.408,56.69 h0.8 r270; Mechanical 6 "3" at 26.408,59.23 h0.8 r270
U2: Mechanical 6 "3" at 31.256,52.931 h0.8 r90; Mechanical 6 "5" at 31.256,55.471 h0.8 r90; Mechanical 6 "4" at 31.256,54.201 h0.8 r90; Mechanical 6 "10" at 41.48,58.011 h0.8 r90; Mechanical 6 "2" at 31.256,51.661 h0.8 r90; Mechanical 6 "1" at 31.256,50.391 h0.8 r90; Mechanical 6 "11" at 41.48,51.661 h0.8 r90; Mechanical 6 "9" at 31.256,60.551 h0.8 r90; Mechanical 6 "6" at 31.256,56.741 h0.8 r90; Mechanical 6 "7" at 31.256,58.011 h0.8 r90; Mechanical 6 "8" at 31.256,59.281 h0.8 r90
U3: Mechanical 6 "3" at 55.933,59.125 h0.8 r270; Mechanical 6 "5" at 55.933,56.585 h0.8 r270; Mechanical 6 "4" at 55.933,57.855 h0.8 r270; Mechanical 6 "10" at 45.709,54.045 h0.8 r270; Mechanical 6 "2" at 55.933,60.395 h0.8 r270; Mechanical 6 "1" at 55.933,61.665 h0.8 r270; Mechanical 6 "11" at 45.709,60.395 h0.8 r270; Mechanical 6 "9" at 55.933,51.505 h0.8 r270; Mechanical 6 "6" at 55.933,55.315 h0.8 r270; Mechanical 6 "7" at 55.933,54.045 h0.8 r270; Mechanical 6 "8" at 55.933,52.775 h0.8 r270
U4: Mechanical 6 "8" at 60.656,59.106 h0.8 r90; Mechanical 6 "7" at 60.656,57.836 h0.8 r90; Mechanical 6 "6" at 60.656,56.566 h0.8 r90; Mechanical 6 "9" at 60.656,60.376 h0.8 r90; Mechanical 6 "11" at 70.88,51.486 h0.8 r90; Mechanical 6 "1" at 60.656,50.216 h0.8 r90; Mechanical 6 "2" at 60.656,51.486 h0.8 r90; Mechanical 6 "10" at 70.88,57.836 h0.8 r90; Mechanical 6 "4" at 60.656,54.026 h0.8 r90; Mechanical 6 "5" at 60.656,55.296 h0.8 r90; Mechanical 6 "3" at 60.656,52.756 h0.8 r90
U5: Mechanical 6 "11" at 17.388,44.89 h0.8; Mechanical 6 "12" at 16.347,43.112 h0.8; Mechanical 6 "2" at 17.579,39.048 h0.8; Mechanical 6 "3" at 19.408,37.803 h0.8; Mechanical 6 "6" at 24.513,40.978 h0.8; Mechanical 6 "8" at 23.294,44.991 h0.8; Mechanical 6 "4" at 21.618,37.981 h0.8; Mechanical 6 "5" at 23.447,39.124 h0.8; Mechanical 6 "9" at 21.491,46.083 h0.8; Mechanical 6 "10" at 19.192,46.007 h0.8; Mechanical 6 "1" at 16.462,40.927 h0.8; Mechanical 6 "7" at 24.412,43.137 h0.8
U6: Mechanical 6 "11" at 31.563,44.415 h0.8; Mechanical 6 "12" at 30.522,42.637 h0.8; Mechanical 6 "2" at 31.754,38.573 h0.8; Mechanical 6 "3" at 33.583,37.328 h0.8; Mechanical 6 "6" at 38.688,40.503 h0.8; Mechanical 6 "8" at 37.469,44.516 h0.8; Mechanical 6 "4" at 35.793,37.506 h0.8; Mechanical 6 "5" at 37.622,38.649 h0.8; Mechanical 6 "9" at 35.666,45.608 h0.8; Mechanical 6 "10" at 33.367,45.532 h0.8; Mechanical 6 "1" at 30.637,40.452 h0.8; Mechanical 6 "7" at 38.587,42.662 h0.8
U7: Mechanical 6 "11" at 59.013,43.965 h0.8; Mechanical 6 "12" at 57.972,42.187 h0.8; Mechanical 6 "2" at 59.204,38.123 h0.8; Mechanical 6 "3" at 61.033,36.878 h0.8; Mechanical 6 "6" at 66.138,40.053 h0.8; Mechanical 6 "8" at 64.919,44.066 h0.8; Mechanical 6 "4" at 63.243,37.056 h0.8; Mechanical 6 "5" at 65.072,38.199 h0.8; Mechanical 6 "9" at 63.116,45.158 h0.8; Mechanical 6 "10" at 60.817,45.082 h0.8; Mechanical 6 "1" at 58.087,40.002 h0.8; Mechanical 6 "7" at 66.037,42.212 h0.8
U8: Mechanical 6 "7" at 52.237,42.587 h0.8; Mechanical 6 "1" at 44.287,40.377 h0.8; Mechanical 6 "10" at 47.017,45.457 h0.8; Mechanical 6 "9" at 49.316,45.533 h0.8; Mechanical 6 "5" at 51.272,38.574 h0.8; Mechanical 6 "4" at 49.443,37.431 h0.8; Mechanical 6 "8" at 51.119,44.441 h0.8; Mechanical 6 "6" at 52.338,40.428 h0.8; Mechanical 6 "3" at 47.233,37.253 h0.8; Mechanical 6 "2" at 45.404,38.498 h0.8; Mechanical 6 "12" at 44.172,42.562 h0.8; Mechanical 6 "11" at 45.213,44.34 h0.8